# Altium PCB MiniPC.PcbDoc (part 24 of 24)
Units mm, origin at the board's own origin, x right, y up, seen from the top; angles counter-clockwise.
Board outline 175 x 155 mm, 16 copper layers (1_Top, 2_int1_(gnd), 3_int2_(power), 4_int3_(gnd), 5_int4_(sign), 6_int5_(power), 7_int6_(sign), 8_int7_(power), 9_int8_(gnd), 10_int9_(sign), 11_int10_(gnd), 12_int11_(sign), 13_int12_(gnd), 14_int13_(power), 15_int14_(gnd), 16_Bottom), stack 2.008 mm thick; 1046 components, 837 nets, 6010 pads, 4009 vias.
Unrouted connection lines stored in the file: 564.
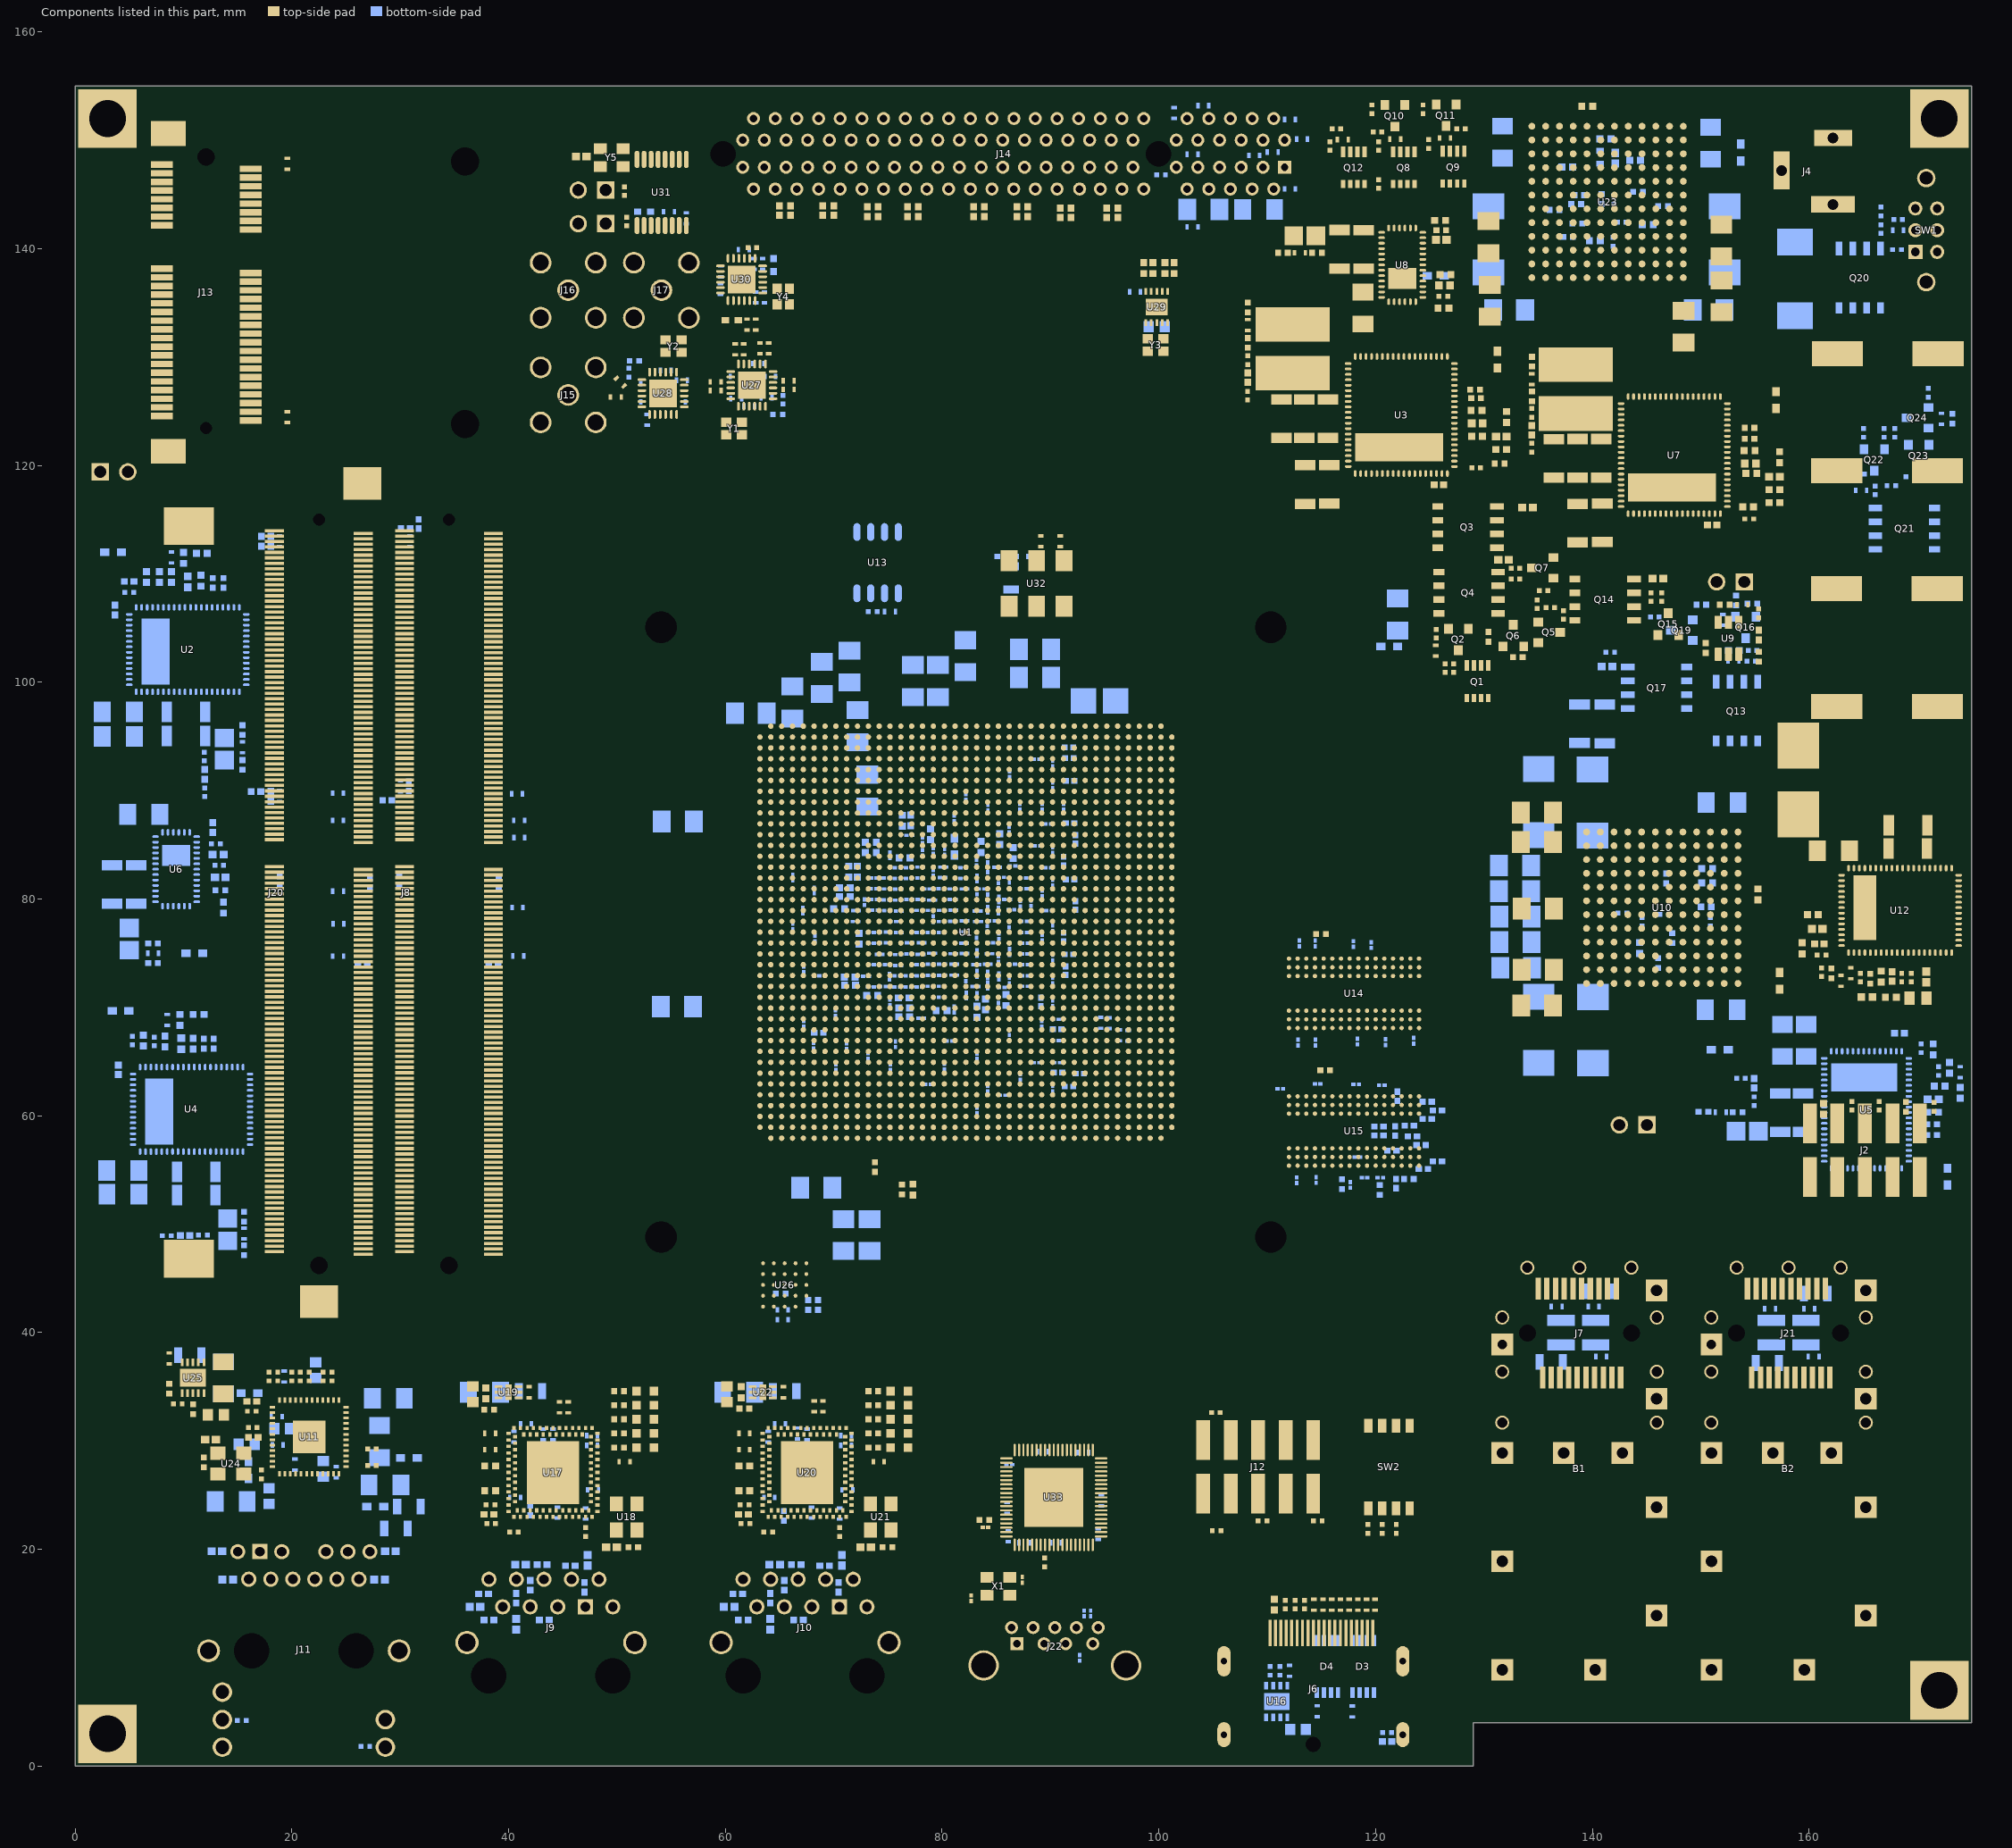
[diagram p36: the components of this part, seen from the top]

## Silkscreen, mask and mechanical layers (free items; w line width, h text height)
Top Overlay:
  lines w0.1: 7.7,25.2 7.9,25.2 7.9,30.1 8.2,30.4 10.9,30.4 11.8,31.3 15.2,31.3 15.4,31.3 ; 7.7,26.7 7.9,26.7 ; 7.7,27.8 7.9,27.8 ; 7.7,29.1 7.9,29.1 ; 15.2,32.7 15.4,32.7 ; 15.4,30.2 15.2,30.2 15.2,33.7 15.4,33.7 ; 41.241,125.833 42.075,126.842 ; 41.3,121.05 41.055,135.118 41.115,135.18 41.875,136.1 ; 42.6,143.45 43,143.85 43,143.875 ; 42.625,144.225 42.975,143.875 43.025,143.875 50.175,143.875 50.525,143.875 ; 49,30.8 49.2,30.8 ; 49,32.1 49.2,32.1 ; 49,33.3 49.2,33.3 ; 49,34.6 49.2,34.6 ; 49.2,29.4 49,29.4 49,35.4 49.9,36.3 49.9,42.5 50.1,42.5 ; 49.9,37.4 50.1,37.4 ; 49.9,38.8 50.1,38.8 ; 49.9,40 50.1,40 ; 49.9,41.2 50.1,41.2 ; 50.7,144.4 50.525,144.225 50.525,143.875 ; 50.9,143.5 50.525,143.875 ; 61.8,131.6 62.1,131.9 62.5,131.9 63.1,131.9 63.6,132.4 66.2,132.4 66.3,132.5 ; 63.4,131.6 63.7,131.9 66,131.9 66.2,131.7 ; 64.5,130.8 65.6,130.8 66.2,130.2 ; 72.45,34.6 72.65,34.6 ; 72.5,30.8 72.7,30.8 ; 72.5,32 72.7,32 ; 72.5,33.3 72.7,33.3 ; 72.5,37.2 72.7,37.2 ; 72.5,38.5 72.7,38.5 ; 72.5,39.8 72.7,39.8 ; 72.5,41.1 72.7,41.1 ; 72.7,29.4 72.5,29.4 72.5,42.3 72.7,42.3 ; 115.3,151.5 115.3,150.6 115.5,150.4 116,150.4 ; 117.8,150.9 118.05,150.65 118.75,150.65 119,150.4 ; 119.1,150.9 119.2,150.8 119.3,150.8 ; 119.8,150 119.4,150 119,150.4 ; 122.8,150.5 123.2,150.5 ; 124.12,110.67 124.32,110.67 124.32,116.07 ; 124.12,111.97 124.32,111.97 ; 124.12,113.27 124.32,113.27 ; 124.12,114.77 124.32,114.77 ; 124.12,116.07 124.32,116.07 ; 124.7,105.6 124.8,105.5 125,105.5 126.7,105.5 ; 128.02,122.77 128.22,122.77 ; 128.02,123.87 128.22,123.87 ; 128.02,125.07 128.22,125.07 ; 128.02,126.17 128.22,126.17 ; 128.22,127.17 128.02,127.17 128.02,118.07 127.19,117.24 125.18,117.24 124.32,116.38 124.32,116.07 ; 130.5,103.2 130.5,102.8 131.15,102.15 131.15,101.85 131.6,101.4 ; 133.61,106.7 134.41,106.7 ; 153.17,120.33 153.37,120.33 ; 153.17,121.53 153.37,121.53 ; 153.17,122.63 153.37,122.63 ; 153.17,123.53 153.37,123.53 ; 153.37,119.03 153.17,119.03 153.17,125.03 154.87,126.73 154.87,133.73 155.07,133.73 ; 154.87,128.73 155.07,128.73 ; 154.87,130.03 155.07,130.03 ; 154.87,131.33 155.07,131.33 ; 154.87,132.53 155.07,132.53 ; 159.7,66.7 159.7,69.1 ; 171.7,73.7 172.6,73.7 172.6,68 172.2,68 ; 119,150.4 119,150.4
  text "PCIE" at 50.6,151.5 h3
  text "miniPCIE" at 5,131.4 h3 r90
  text "133.33 MHz" at 40.075,118.625 h3
  text "ARRIA 10" at 63.7,118.2 h10
  text "2016.11.03" at 120.599,81.636 h1.52 r90
  text "DDR4" at 129.2,69.15 h3 r90
  text "Micron" at 121.158,64.033 h3
  text "DDR4-SODIMM" at 44.6,59.5 h5 r90
  text "DDR4" at 129.55,51.5 h3 r90
  text "SFP-B" at 155.1,49.5 h3
  text "SFP-A" at 135.5,49.4 h3
  text "JTAG" at 106.5,35.3 h3
  text "ETHERNET" at 34.1,2.7 h3 r90
  text "USB3.0" at 81.1,2.7 h3 r90
  text "ETHERNET" at 56.3,2.1 h3 r90
  text "ETHERNET-HPS" at 9.7,1.5 h3 r90
  text "DISPLAY PORT" at 102.9,1.5 h3 r90
Bottom Overlay:
  drawing of 190 lines, arcs and shapes, not listed
  text "B" at 38.03,107.49 h1.5
  text "A" at 102.8,93.6 h1.5
  text "A" at 83.9,90.1 h1.5
  text "B" at 68.4,85.8 h1.5
  text "C" at 72.4,67.6 h1.5
  text "D" at 85.5,64.4 h1.5
  text "C" at 55.8,64.3 h1.5
  text "D" at 82.9,48.2 h1.5
Top Solder:
  rectangle: 0.3,0.3 5.7,5.7
  rectangle: 0.3,149.3 5.7,154.7
  rectangle: 169.3,149.3 174.7,154.7
  rectangle: 169.3,4.3 174.7,9.7
Bottom Solder:
  rectangle: 0.3,149.3 5.7,154.7
  rectangle: 0.3,0.3 5.7,5.7
  rectangle: 169.3,4.3 174.7,9.7
  rectangle: 169.3,149.3 174.7,154.7
  rectangle: 0.3,0.3 5.7,5.7
OGR:
  circle w0.1: c36,148.025 r2.9
  circle w0.1: c54.069,48.814 r3
  circle w0.1: c54.069,105.064 r3
  circle w0.1: c36,123.825 r2.9
  circle w0.1: c110.319,48.814 r3
  circle w0.1: c110.319,105.064 r3
Board Shape:
  the board outline again, w0.1
Bottom Courtyard:
  lines w0.1: 12.7,110.3 13,110.7 ; 164.9,116.7 165.3,117.1 165.5,117.1 ; 167.2,143.1 167.2,141.8 167.3,141.8
Notes:
  text "Press F5 to enable/disable net color highlighting" at -0.11,-17.16 h8

## Dimensions
0,129.1 to 175,126.53 on Dimensions
175,4 to 129,0 on Dimensions
7.41,0 to 15.63,155 on Dimensions
128.48,0 to 131.65,4 on Dimensions
2.64,0 to 3,3 on Dimensions
3,3 to 172,152 on Dimensions
0,2.56 to 3,3 on Dimensions
3,3 to 172,7 on Dimensions
3,3 to 172,7 on Dimensions